# Altium PCB EEM_FMC_Carrier.PcbDoc (part 13 of 19)
Units mm, origin at the board's own origin, x right, y up, seen from the top; angles counter-clockwise.
Board outline 222.9 x 100 mm, 6 copper layers (TopLayer, MidLayer1, MidLayer2, SignalLayer1, Internal Plane 1, BottomLayer), stack 1.528 mm thick; 790 components, 743 nets, 3570 pads, 2277 vias.
Unrouted connection lines stored in the file: 3.
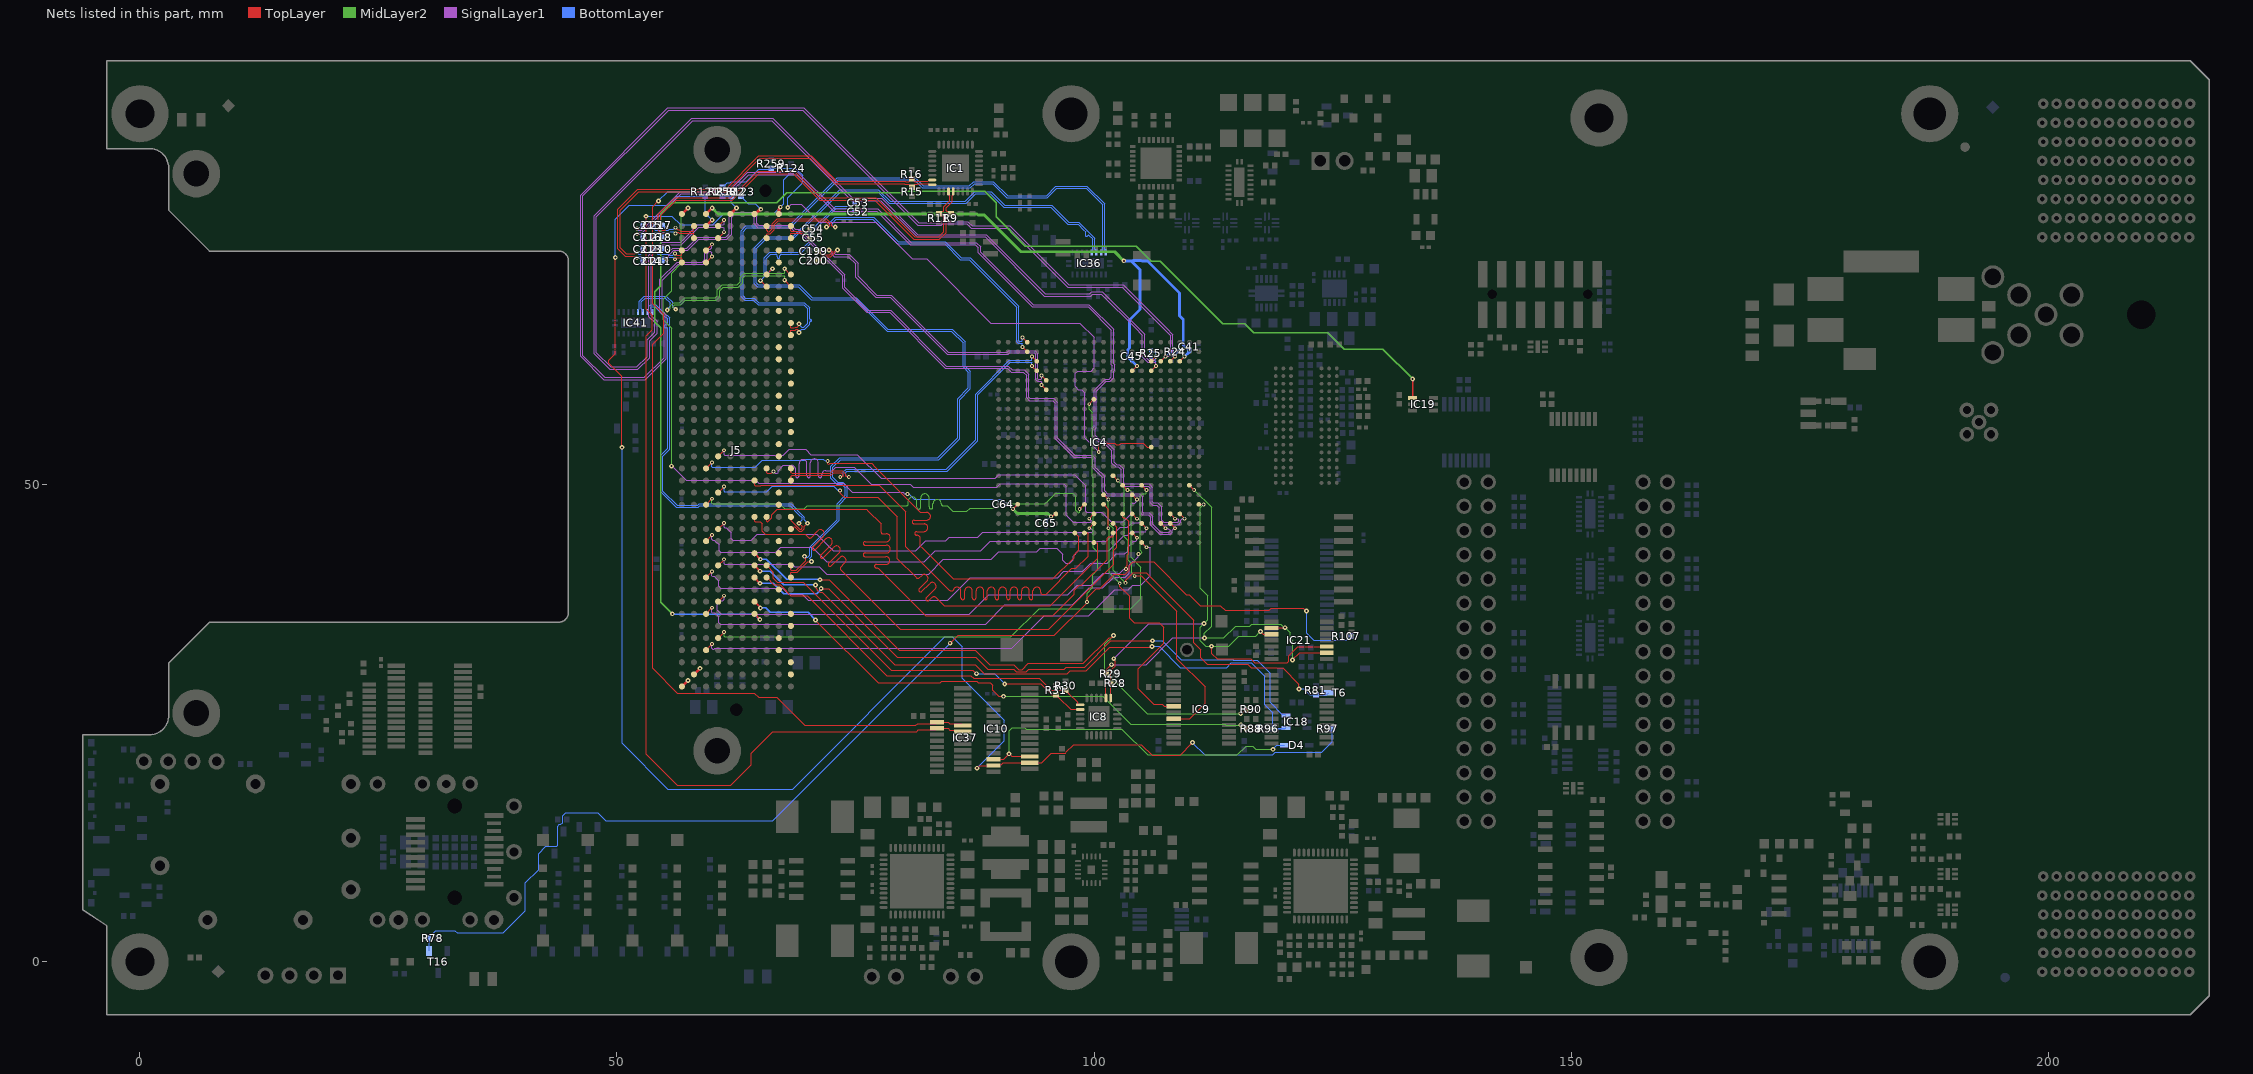
[diagram p15: the nets of this part, all layers, seen from the top]

## Via types
v1: diameter 0.4, hole 0.2, TopLayer to BottomLayer, tented both sides, 1032 vias
v2: diameter 0.5, hole 0.2, TopLayer to BottomLayer, tented both sides, 979 vias
v3: diameter 0.5, hole 0.2, TopLayer to BottomLayer, 162 vias
v4: diameter 0.8, hole 0.5, TopLayer to BottomLayer, tented both sides, 102 vias
v5: diameter 0.6, hole 0.3, TopLayer to BottomLayer, tented both sides, 2 vias

## Nets (pads, with @x,y where several pads share a name; then routed paths per layer and width w, separated by ;. In a path a pad name is that pad's centre, name@x,y a point inside that pad or via, vN(x,y) a via of type N, cw(c..) or ccw(c..) an arc to the next point about the centre after c; other vN are vias at no path point) (continued)
FMC.LA_P18: IC4.W11 J5.c22 | length 49.1
  TopLayer w0.085: J5.c22@65.688,51.719 65.688,51.24 65.738,51.19 65.909,51.19 65.923,51.204 66.189,51.204 66.381,51.396 v1(66.389,51.396) ; v1(99.498,46.45) IC4.W11@99.998,46.95
  SignalLayer1 w0.11: v1(66.389,51.396) 66.419,51.396 66.599,51.217 66.824,51.217 66.888,51.281 66.888,51.498 67.399,52.009 67.427,52.037 68.304,52.037 cw(c68.304,51.62) 68.721,51.62 68.721,50.934 ccw(c68.901,50.934) 69.081,50.934 69.081,52.222 cw(c69.498,52.222) 69.915,52.222 69.915,50.934 ccw(c70.095,50.934) 70.275,50.934 70.275,52.298 cw(c70.692,52.298) 71.109,52.298 71.109,50.934 ccw(c71.289,50.934) 71.469,50.934 71.469,51.058 cw(c71.886,51.058) 71.886,51.475 72.06,51.475 72.565,51.475 72.915,51.825 74.85,51.825 76.638,50.037 80.738,50.037 81.032,49.743 89.782,49.743 90.159,50.119 96.816,50.119 97.1,49.835 97.1,46.8 97.838,46.062 99.666,46.062 99.73,46.126 99.73,46.218 99.576,46.372 99.576,46.45 v1(99.498,46.45)
FMC.LA_P19: IC4.AA9 J5.h22 | length 56.4
  TopLayer w0.085: J5.h22@59.338,51.719 59.948,52.329 v1(59.948,52.35) ; v1(72.083,52.497) 72.11,52.47 72.11,52.231 72.171,52.169 72.242,52.169 72.307,52.234 76.69,52.234 77.025,51.9 77.175,51.75 81.629,47.296 81.703,47.222 ccw(c81.987,47.509) 81.704,47.221 ccw(c81.987,47.508) 81.987,47.105 82.464,47.105 cw(c82.464,46.7) 82.868,46.7 cw(c82.464,46.7) 82.464,46.296 81.144,46.296 ccw(c81.144,46.103) 80.952,46.103 ccw(c81.144,46.103) 81.144,45.911 82.183,45.911 cw(c82.183,45.506) 82.588,45.506 cw(c82.183,45.506) 82.183,45.102 81.407,45.102 ccw(c81.407,44.909) 81.215,44.909 ccw(c81.407,44.909) 81.407,44.717 ; 81.408,44.717 cw(c81.408,44.312) 81.812,44.312 81.812,43.563 81.975,43.4 85.175,40.2 85.225,40.15 95.7,40.15 97.913,42.363 97.913,42.663 98.379,43.129 98.379,44.33 98.388,44.338 98.388,44.56 IC4.AA9@97.998,44.95
  BottomLayer w0.085: v1(59.948,52.35) 59.948,51.871 59.998,51.821 60.737,51.821 60.741,51.825 64.475,51.825 65.212,52.562 69.712,52.562 69.837,52.687 71.631,52.687 71.806,52.512 72.067,52.512 v1(72.083,52.497)
FMC.LA_P20: IC4.U15 J5.g21 | length 52.3
  TopLayer w0.085: J5.g21@60.608,52.989 61.218,53.599 v1(61.218,53.62) ; IC4.U15@103.998,48.95 v1(104.498,48.45)
  SignalLayer1 w0.11: v1(61.218,53.62) 61.218,53.168 61.282,53.104 61.991,53.104 61.994,53.1 67.44,53.1 68.052,53.712 69.773,53.712 70.323,53.162 75.198,53.162 77.673,50.687 88.498,50.687 89.627,50.687 90.002,51.062 97.998,51.062 99.15,49.91 99.15,47.225 99.256,47.119 100.831,47.119 101.831,46.119 103.059,46.119 103.829,46.889 103.829,47.865 104.032,48.068 104.275,48.068 104.443,48.236 104.443,48.394 v1(104.498,48.45)
FMC.LA_P21: IC4.V10 J5.h25 | length 49.4
  TopLayer w0.085: J5.h25@59.338,47.909 59.948,48.519 v1(59.948,48.54) ; v1(98.498,47.45) IC4.V10@98.998,47.95
  MidLayer2 w0.11: v1(59.948,48.54) 59.948,48.088 60.012,48.024 67.026,48.024 67.575,47.475 69.625,47.475 69.943,47.793 80.154,47.793 80.327,47.793 ccw(c80.327,47.998) 80.532,47.998 80.532,48.28 cw(c80.974,48.28) 80.974,48.722 cw(c80.974,48.28) 81.416,48.28 81.416,47.647 ccw(c81.621,47.647) 81.621,47.442 ccw(c81.621,47.647) 81.826,47.647 81.826,48.603 cw(c82.268,48.603) 82.268,49.045 cw(c82.268,48.603) 82.71,48.603 82.71,47.674 ccw(c82.915,47.674) 82.915,47.469 ccw(c82.915,47.674) 83.12,47.674 83.12,47.998 cw(c83.562,47.998) 83.562,48.44 cw(c83.562,47.998) 84.004,47.998 ccw(c84.209,47.998) 84.209,47.793 84.632,47.793 84.774,47.651 85.207,47.218 86.682,47.218 87.027,47.562 89.902,47.562 90.365,48.025 94.915,48.025 96.002,49.112 97.748,49.112 98.072,48.788 98.072,47.331 98.334,47.068 98.425,47.068 98.498,47.141 v1(98.498,47.45)
FMC.LA_P22: IC4.AB11 J5.g24 | length 58.8
  TopLayer w0.085: J5.g24@60.608,49.179 61.218,49.789 v1(61.218,49.81) ; v1(73.372,49.389) 73.38,49.381 73.38,49.111 73.804,48.687 77.338,48.687 79.375,46.65 79.375,42.275 81.3,40.35 81.374,40.276 81.405,40.245 ccw(c81.541,40.381) 81.677,40.245 81.922,40.49 cw(c82.207,40.203) 82.493,40.489 cw(c82.207,40.203) 82.524,39.952 82.524,39.948 81.686,39.11 ccw(c81.823,38.974) 81.686,38.838 ccw(c81.823,38.974) 81.959,38.838 ; 81.959,38.838 82.767,39.646 cw(c83.051,39.359) 83.337,39.645 cw(c83.051,39.359) 83.368,39.107 83.368,39.104 82.424,38.159 ccw(c82.56,38.023) 82.424,37.887 ccw(c82.56,38.023) 82.696,37.886 ; 82.696,37.887 82.944,38.134 cw(c83.23,37.848) 83.481,38.165 83.485,38.165 84.325,37.325 85.1,37.325 95.4,37.325 100.392,42.317 100.392,43.9 100.342,43.95 IC4.AB11@99.998,43.95
  BottomLayer w0.085: v1(61.218,49.81) 61.218,49.331 61.268,49.281 65.681,49.281 66.262,49.862 72.702,49.862 73.127,49.437 73.324,49.437 v1(73.372,49.389)
FMC.LA_P23: IC4.AA10 J5.d23 | length 62.2
  TopLayer w0.085: J5.d23@64.418,50.449 64.418,49.97 64.468,49.92 65.082,49.92 65.125,49.962 77.488,49.962 80.275,47.175 80.275,43.5 82.275,41.5 82.425,41.35 84.604,39.171 84.821,38.954 ccw(c85.05,39.286) 85.248,38.935 cw(c85.648,38.874) 85.648,39.279 cw(c85.648,38.874) 86.053,38.874 86.053,38.152 ccw(c86.245,38.152) 86.245,37.96 ccw(c86.245,38.152) 86.438,38.152 86.438,38.874 cw(c86.842,38.874) 86.842,39.279 cw(c86.842,38.874) 87.247,38.874 87.247,38.152 ccw(c87.439,38.152) 87.439,37.96 ccw(c87.439,38.152) 87.632,38.152 87.632,38.874 cw(c88.036,38.874) 88.036,39.279 cw(c88.036,38.874) 88.441,38.874 88.441,38.152 ccw(c88.633,38.152) 88.633,37.96 ccw(c88.633,38.152) 88.826,38.152 88.826,38.874 cw(c89.23,38.874) 89.23,39.279 cw(c89.23,38.874) 89.635,38.874 89.635,38.152 ccw(c89.827,38.152) 89.827,37.96 ccw(c89.827,38.152) 90.02,38.152 90.02,38.874 cw(c90.424,38.874) 90.424,39.279 cw(c90.424,38.874) 90.829,38.874 90.829,38.152 ccw(c91.021,38.152) 91.021,37.96 ccw(c91.021,38.152) 91.214,38.152 91.214,38.874 cw(c91.618,38.874) 91.618,39.279 cw(c91.618,38.874) 92.023,38.874 92.023,38.152 ccw(c92.215,38.152) 92.215,37.96 ccw(c92.215,38.152) 92.408,38.152 92.408,38.874 cw(c92.812,38.874) 92.812,39.279 cw(c92.812,38.874) 93.217,38.874 93.217,38.152 ccw(c93.409,38.152) 93.409,37.96 ccw(c93.409,38.152) 93.602,38.152 93.602,38.874 cw(c94.006,38.874) 94.006,39.279 cw(c94.006,38.874) 94.411,38.874 94.411,38.717 ccw(c94.603,38.717) 94.603,38.525 94.975,38.525 95.162,38.711 97.685,41.235 98.11,41.235 99.392,42.517 99.392,44.9 99.342,44.95 IC4.AA10@98.998,44.95
FMC.LA_P24: IC4.W15 J5.h28 | length 51
  TopLayer w0.085: J5.h28@59.338,44.099 59.948,44.709 v1(59.948,44.73) ; IC4.W15@103.998,46.95 v1(104.498,46.45)
  SignalLayer1 w0.11: v1(59.948,44.73) 59.948,44.278 60.012,44.214 60.202,44.214 60.7,43.715 60.7,43.075 60.825,42.95 66.665,42.95 67.177,43.462 70.463,43.462 72,41.925 82.19,41.925 83.377,43.112 88.153,43.112 89.117,44.076 101.291,44.076 102.74,45.525 103.475,45.525 103.998,46.048 104.702,46.048 104.834,46.179 104.834,46.271 104.71,46.394 104.554,46.394 v1(104.498,46.45)
FMC.LA_P25: IC4.Y11 J5.g27 | length 44
  TopLayer w0.085: J5.g27@60.608,45.369 61.218,45.979 v1(61.218,46) ; v1(99.498,45.45) IC4.Y11@99.998,45.95
  SignalLayer1 w0.11: v1(61.218,46) 61.218,45.548 61.282,45.484 61.472,45.484 61.995,44.96 61.995,44.365 62.148,44.212 64.087,44.212 64.687,44.812 70.913,44.812 72.65,43.075 81.325,43.075 82.375,44.125 84.475,44.125 84.837,44.487 87.802,44.487 88.333,45.018 99.815,45.018 99.88,45.082 99.88,45.25 99.735,45.395 99.553,45.395 v1(99.498,45.45)
FMC.LA_P26: IC4.Y13 J5.d26 | length 64.1
  TopLayer w0.085: J5.d26@64.418,46.639 64.418,46.16 64.468,46.11 65.025,46.11 65.226,45.909 65.226,45.149 65.55,44.825 69.725,44.825 69.975,44.575 70.08,44.47 ccw(c70.216,44.606) 70.352,44.47 71.048,45.166 cw(c71.333,44.879) 71.619,45.165 cw(c71.333,44.879) 71.65,44.627 71.65,44.624 70.499,43.473 ccw(c70.635,43.337) 70.499,43.201 ccw(c70.635,43.337) 70.772,43.201 71.892,44.321 cw(c72.177,44.034) 72.463,44.32 cw(c72.177,44.034) 72.494,43.783 72.494,43.779 71.344,42.629 ccw(c71.48,42.493) 71.344,42.356 ccw(c71.48,42.493) 71.616,42.356 72.737,43.477 cw(c73.021,43.19) 73.307,43.476 cw(c73.021,43.19) 73.338,42.939 73.338,42.935 72.188,41.784 ccw(c72.324,41.648) 72.188,41.512 ccw(c72.324,41.648) 72.46,41.512 ; 72.461,41.513 73.325,42.377 cw(c73.61,42.09) 73.896,42.376 cw(c73.61,42.09) 73.896,41.804 73.457,41.365 ccw(c73.593,41.229) 73.457,41.093 73.9,40.65 79.675,34.875 95.275,34.875 102.088,41.688 102.088,43.138 102.379,43.429 102.379,45.33 102.388,45.338 102.388,45.56 IC4.Y13@101.998,45.95
FMC.LA_P27: IC4.AA13 J5.c26 | length 63.2
  TopLayer w0.085: J5.c26@65.688,46.639 65.688,46.16 65.738,46.11 65.808,46.11 65.858,46.16 ; 65.858,46.16 66.238,46.54 66.238,46.863 66.787,47.412 76.188,47.412 76.25,47.35 77.675,45.925 77.675,45.2 77.675,45.051 ccw(c77.867,45.051) 77.867,44.859 78.245,44.859 cw(c78.245,44.454) 78.65,44.454 cw(c78.245,44.454) 78.245,44.05 76.005,44.05 ccw(c76.005,43.857) 75.812,43.857 ccw(c76.005,43.857) 76.005,43.665 78.245,43.665 cw(c78.245,43.26) 78.65,43.26 cw(c78.245,43.26) 78.245,42.856 76.005,42.856 ccw(c76.005,42.663) 75.812,42.663 ccw(c76.005,42.663) 76.005,42.471 78.189,42.471 cw(c78.189,42.066) 78.594,42.066 cw(c78.189,42.066) 78.189,41.662 77.18,41.662 ccw(c77.18,41.469) 76.988,41.469 ccw(c77.18,41.469) 77.18,41.277 cw(c77.18,40.872) 77.432,41.19 77.435,41.19 77.466,41.159 78.575,40.05 80.325,38.3 80.475,38.15 82.375,36.25 95.65,36.25 97.938,38.538 97.938,38.934 98.454,39.45 98.675,39.45 101.379,42.154 101.379,44.382 101.553,44.556 101.948,44.556 101.998,44.606 IC4.AA13@101.998,44.95
FMC.LA_P28: IC4.AA15 J5.h31 | length 51.1
  TopLayer w0.085: J5.h31@59.338,40.289 59.948,40.899 v1(59.948,40.92) ; IC4.AA15@103.998,44.95 v1(104.498,44.45)
  SignalLayer1 w0.11: v1(59.948,40.92) 59.948,40.468 60.012,40.404 60.202,40.404 60.65,39.955 60.65,39.35 60.825,39.175 67.362,39.175 68.025,38.512 69.438,38.512 70.063,37.887 84.662,37.887 87.037,40.262 96.177,40.262 96.84,40.925 98.815,40.925 99.665,41.775 101.365,41.775 102.34,42.75 103.213,42.75 103.513,43.05 103.513,43.473 104.108,44.068 104.35,44.068 104.467,44.185 104.467,44.419 v1(104.498,44.45)
FMC.LA_P29: IC4.Y16 J5.g30 | length 50.9
  TopLayer w0.085: J5.g30@60.608,41.559 61.218,42.169 v1(61.218,42.19) ; IC4.Y16@104.998,45.95 v1(105.498,45.45)
  SignalLayer1 w0.11: v1(61.218,42.19) 61.218,41.738 61.282,41.674 68.351,41.674 68.613,41.412 71.213,41.412 72,40.625 82.665,40.625 84.215,42.175 89.215,42.175 90.034,42.994 93.984,42.994 94.352,43.362 96.088,43.362 96.715,42.735 96.715,42.085 97.025,41.775 97.44,41.775 97.8,42.135 97.8,42.535 98.365,43.1 101.54,43.1 103.152,44.712 103.545,44.712 103.902,45.068 105.4,45.068 105.492,45.16 105.492,45.444 v1(105.498,45.45)
FMC.LA_P30: IC4.T16 J5.h34 | length 58.9
  TopLayer w0.085: J5.h34@59.338,36.479 59.948,37.089 v1(59.948,37.11) ; IC4.T16@104.998,49.95 v1(105.498,49.45)
  MidLayer2 w0.11: v1(104.648,42.75) 104.668,42.77 104.924,42.77 105.013,42.858 105.013,42.949 104.829,43.133 104.829,45.587 104.829,48.865 105.032,49.068 105.434,49.068 105.498,49.133 v1(105.498,49.45)
  SignalLayer1 w0.11: v1(59.948,37.11) 59.948,36.658 60.012,36.594 60.202,36.594 60.65,36.145 60.65,35.562 60.812,35.4 88.64,35.4 90.665,37.425 97.765,37.425 99.527,39.187 100.939,39.187 102.052,40.3 103.3,40.3 103.713,40.713 103.713,41.558 104.628,42.474 104.628,42.73 v1(104.648,42.75)
FMC.LA_P31: IC4.W14 J5.g33 | length 54.2
  TopLayer w0.085: J5.g33@60.608,37.749 61.218,38.359 v1(61.218,38.38) ; IC4.W14@102.998,46.95 102.998,46.606 103.048,46.556 103.227,46.556 103.616,46.167 103.616,42.793 103.467,42.644 103.467,41.577 103.357,41.467 103.357,41.198 v1(103.366,41.189)
  SignalLayer1 w0.11: v1(61.218,38.38) 61.218,38.005 61.075,37.862 60.691,37.862 60.488,37.659 60.488,36.827 60.902,36.413 86.913,36.413 88.963,38.463 97.238,38.463 98.263,39.488 99.716,39.488 100.958,40.73 102.685,40.73 103.107,41.152 103.329,41.152 v1(103.366,41.189)
FMC.LA_P32: IC4.AB16 J5.h37 | length 54.5
  TopLayer w0.085: J5.h37@59.338,32.669 59.948,33.279 v1(59.948,33.3) ; IC4.AB16@104.998,43.95 v1(105.498,43.45)
  SignalLayer1 w0.11: v1(59.948,33.3) 59.948,32.848 60.012,32.784 60.182,32.784 60.261,32.862 91.352,32.862 94.765,36.275 99.465,36.275 102.19,39 103.59,39 104.083,39.493 104.908,39.493 105.888,40.473 105.888,41.933 105.888,42.45 105.888,43.386 105.824,43.45 v1(105.498,43.45)
FMC.LA_P33: IC4.T14 J5.g36 | length 59.5
  TopLayer w0.085: J5.g36@60.608,33.939 61.218,34.549 v1(61.218,34.57) ; IC4.T14@102.998,49.95 v1(103.498,49.45)
  MidLayer2 w0.11: v1(61.218,34.57) 61.218,34.118 61.282,34.054 91.268,34.054 94.24,37.025 103.85,37.025 104.888,38.063 104.888,41.377 103.88,42.385 103.88,49.386 103.815,49.45 v1(103.498,49.45)
FMC_CLK.CLK_BIDIR_N2: C211.2 IC4.Y19 | length 79.6
  TopLayer w0.085: IC4.Y19@107.998,45.95 v1(108.498,45.45)
  SignalLayer1 w0.11: v1(55.221,73.546) 55.276,73.602 55.276,73.766 55.425,73.915 55.425,74.064 55.936,74.575 57.41,74.575 58.568,75.732 61.504,75.732 62.012,76.241 62.012,78.062 62.275,78.325 64.1,78.325 64.4,78.025 64.4,77.339 64.776,76.963 68.187,76.963 68.594,76.556 69.009,76.556 73.65,71.915 73.65,70.615 76.202,68.063 78.577,68.063 84.427,62.213 90.932,62.213 91.332,61.813 92.603,61.813 92.925,61.49 92.925,59.102 93.202,58.825 95.666,58.825 95.93,58.562 95.93,54.82 97.887,52.863 99.687,52.863 99.884,52.666 99.884,51.766 100.875,50.775 100.875,49.27 101.294,48.85 104.675,48.85 104.871,48.654 104.871,47.049 105.074,46.845 105.668,46.845 105.93,46.583 105.93,45.768 106.89,44.808 107.975,44.808 108.207,45.04 108.207,45.221 108.435,45.45 v1(108.498,45.45)
  BottomLayer w0.085: C211.2@54.673,73.45 54.769,73.546 v1(55.221,73.546)
FMC_CLK.CLK_BIDIR_N3: C216.2 IC4.W20 | length 90.6
  TopLayer w0.085: IC4.W20@108.998,46.95 v1(109.498,46.45)
  SignalLayer1 w0.11: v1(52.098,76.275) 52.126,76.275 52.307,76.457 52.706,76.457 56.738,80.488 61.763,80.488 63.8,82.525 68.865,82.525 72.715,78.675 77.215,78.675 80.74,75.15 87.575,75.15 87.888,74.837 87.888,74.302 93.54,68.65 99.375,68.65 101.825,66.2 101.825,62.591 101.931,62.485 101.931,62.081 101.829,61.979 101.829,61.313 101.594,61.078 101.193,61.078 100.007,59.893 100.007,56.068 99.882,55.942 99.882,55.108 100.49,54.5 100.925,54.5 101.863,53.562 101.863,52.282 102.263,51.882 102.558,51.882 102.863,51.577 102.863,50.127 103.14,49.85 105.688,49.85 105.888,49.65 105.888,48.139 106.152,47.875 106.575,47.875 106.863,47.587 106.863,46.202 107.227,45.838 108.871,45.838 109.117,46.083 109.117,46.3 109.234,46.418 109.466,46.418 v1(109.498,46.45)
  BottomLayer w0.085: v1(52.098,76.275) 52.103,76.275 52.297,76.469 52.481,76.469 52.53,76.419 52.53,76.217 C216.2@52.798,75.95
FMC_CLK.CLK_BIDIR_P2: C210.2 IC4.Y18 | length 79
  TopLayer w0.085: IC4.Y18@106.998,45.95 v1(107.498,45.45)
  SignalLayer1 w0.11: v1(55.264,74.52) 55.308,74.476 55.36,74.528 55.554,74.528 55.838,74.812 57.312,74.812 58.469,75.969 61.406,75.969 61.775,76.339 61.775,78.16 62.177,78.562 64.198,78.562 64.637,78.123 64.637,77.437 64.874,77.2 68.285,77.2 68.693,76.793 69.107,76.793 73.887,72.013 73.887,70.713 76.3,68.3 78.675,68.3 84.525,62.45 91.03,62.45 91.43,62.05 92.701,62.05 93.162,61.588 93.162,59.2 93.3,59.062 95.765,59.062 96.167,58.66 96.167,54.918 97.985,53.1 99.785,53.1 100.121,52.765 100.121,51.865 101.112,50.873 101.112,49.368 101.393,49.087 104.773,49.087 105.108,48.752 105.108,47.147 105.173,47.082 105.766,47.082 106.167,46.681 106.167,45.866 106.988,45.045 107.877,45.045 107.97,45.138 107.97,45.229 107.804,45.394 107.554,45.394 v1(107.498,45.45)
  BottomLayer w0.085: C210.2@54.698,74.7 54.877,74.52 v1(55.264,74.52)
FMC_CLK.CLK_BIDIR_P3: C215.2 IC4.W19 | length 90.2
  TopLayer w0.085: IC4.W19@107.998,46.95 v1(108.498,46.45)
  SignalLayer1 w0.11: v1(52.098,76.875) 52.126,76.875 52.307,76.694 52.608,76.694 56.64,80.725 61.665,80.725 63.702,82.762 68.963,82.762 72.813,78.912 77.313,78.912 80.838,75.387 87.673,75.387 88.125,74.935 88.125,74.4 93.638,68.887 99.473,68.887 102.062,66.298 102.062,62.689 102.168,62.583 102.168,61.983 102.066,61.881 102.066,61.215 101.692,60.841 101.291,60.841 100.244,59.794 100.244,55.969 100.119,55.844 100.119,55.207 100.588,54.737 101.023,54.737 102.1,53.66 102.1,52.38 102.361,52.119 102.656,52.119 103.1,51.675 103.1,50.225 103.238,50.087 105.786,50.087 106.125,49.748 106.125,48.237 106.25,48.112 106.673,48.112 107.1,47.685 107.1,46.3 107.325,46.075 108.773,46.075 108.88,46.182 108.88,46.3 108.762,46.418 108.53,46.418 v1(108.498,46.45)
  BottomLayer w0.085: v1(52.098,76.875) 52.103,76.875 52.297,76.681 52.481,76.681 52.53,76.731 52.53,76.933 C215.2@52.798,77.2
FMC_CLK.CLK_M2C_N0: IC4.C19 J5.h5 R24.2 | length 124.3
  TopLayer w0.085: J5.h5@59.338,73.309 59.948,73.919 v1(59.948,73.94) ; IC4.C19@107.998,62.95 v1(108.498,63.45)
  SignalLayer1 w0.11: v1(59.948,73.94) 59.948,74.309 59.8,74.457 59.709,74.457 59.45,74.198 59.45,73.525 59.038,73.113 56.413,73.113 54.725,71.425 54.725,68.234 55.187,67.772 55.187,63.227 52.973,61.013 48.627,61.013 46.188,63.452 46.188,80.373 55.327,89.512 69.573,89.512 81.642,77.443 83.908,77.443 84.059,77.594 86.766,77.594 87.223,77.137 91.148,77.137 97.335,70.95 103.06,70.95 107.56,66.45 108.275,65.735 108.275,63.9 108.117,63.742 108.117,63.514 108.181,63.45 v1(108.498,63.45)
  BottomLayer w0.085: v1(108.498,63.45) 108.498,63.535 108.641,63.678 108.641,63.783 108.808,63.95 R24.2@108.828,63.95
FMC_CLK.CLK_M2C_N1: IC4.C17 J5.g3 R25.2 | length 120.1
  TopLayer w0.085: J5.g3@60.608,75.849 61.218,76.459 v1(61.218,76.48) ; IC4.C17@105.998,62.95 v1(106.498,63.45)
  SignalLayer1 w0.11: v1(61.218,76.48) 61.218,76.932 61.154,76.997 58.572,76.997 56.757,75.182 54.782,75.182 53.587,73.987 53.587,67.738 54.2,67.125 54.2,65.901 53.412,65.113 53.412,63.337 52.188,62.113 49.227,62.113 47.613,63.727 47.613,75.323 47.613,78.198 57.826,88.411 66.326,88.411 74.725,80.012 77.763,80.012 81.55,76.225 88.7,76.225 94.906,70.019 99.548,70.019 99.766,70.237 100.863,70.237 104.65,66.45 105.3,65.8 105.3,63.5 105.731,63.069 106.4,63.069 106.492,63.16 106.492,63.444 v1(106.498,63.45)
  BottomLayer w0.085: R25.2@105.973,64.105 106.108,63.97 106.353,63.97 106.498,63.825 v1(106.498,63.45)
FMC_CLK.CLK_M2C_P0: IC4.C18 J5.h4 R24.1 | length 123.4
  TopLayer w0.085: J5.h4@59.338,74.579 59.948,75.189 v1(59.948,75.21) ; IC4.C18@106.998,62.95 v1(107.498,63.45)
  SignalLayer1 w0.11: v1(59.948,75.21) 59.948,74.842 59.8,74.694 59.611,74.694 59.213,74.296 59.213,73.623 58.94,73.35 56.315,73.35 54.488,71.523 54.488,68.136 54.95,67.674 54.95,63.325 52.875,61.25 48.725,61.25 46.425,63.55 46.425,80.275 55.425,89.275 69.475,89.275 81.544,77.206 84.006,77.206 84.157,77.357 86.668,77.357 87.125,76.9 91.05,76.9 97.237,70.713 102.962,70.713 107.225,66.45 108.038,65.637 108.038,63.998 107.88,63.84 107.88,63.514 107.815,63.45 v1(107.498,63.45)
  BottomLayer w0.085: v1(107.498,63.45) 107.831,63.783 108.001,63.783 R24.1@108.168,63.95
FMC_CLK.CLK_M2C_P1: IC4.D17 J5.g2 R25.1 | length 119.5
  TopLayer w0.085: J5.g2@60.608,77.119 61.218,77.729 v1(61.218,77.75) ; IC4.D17@105.998,61.95 v1(106.498,62.45)
  SignalLayer1 w0.11: v1(61.218,77.75) 61.218,77.298 61.154,77.234 58.473,77.234 56.659,75.419 54.684,75.419 53.35,74.085 53.35,67.64 53.963,67.027 53.963,65.999 53.175,65.211 53.175,63.435 52.09,62.35 49.325,62.35 47.85,63.825 47.85,78.1 57.924,88.174 66.228,88.174 74.627,79.775 77.665,79.775 81.452,75.988 88.602,75.988 94.808,69.782 99.646,69.782 99.864,70 100.765,70 104.315,66.45 105.063,65.702 105.063,63.402 105.633,62.832 106.4,62.832 106.492,62.74 106.492,62.456 v1(106.498,62.45)
  BottomLayer w0.085: R25.1@105.973,63.445 105.973,63.425 106.14,63.258 106.16,63.258 106.498,62.92 v1(106.498,62.45)
FMC_CLK_BIDIR_N2: C211.1 C214.1 J5.k5 | length 3.9
  TopLayer w0.1: v1(56.073,73.644) 56.112,73.644 56.282,73.814 56.734,73.814 56.798,73.749 J5.k5@56.798,73.309
  BottomLayer w0.1: C211.1@53.773,73.45 54.033,73.71 54.033,73.718 54.238,73.923 55.313,73.923 55.406,73.83 55.864,73.83 56.051,73.644 v1(56.073,73.644)
FMC_CLK_BIDIR_N3: C216.1 C218.1 J5.j3 | length 5.4
  TopLayer w0.1: v1(56.123,76.35) 56.204,76.35 56.318,76.464 56.436,76.464 56.551,76.349 58.009,76.349 58.068,76.291 J5.j3@58.068,75.849
  BottomLayer w0.1: C216.1@53.698,75.95 53.958,76.21 53.958,76.403 54.017,76.462 55.489,76.462 55.564,76.537 55.914,76.537 56.101,76.35 v1(56.123,76.35)
FMC_CLK_BIDIR_P2: C210.1 C213.1 J5.k4 | length 3.9
  TopLayer w0.1: v1(56.073,74.244) 56.112,74.244 56.282,74.074 56.734,74.074 56.798,74.138 J5.k4@56.798,74.579
  BottomLayer w0.1: C210.1@53.798,74.7 53.798,74.6 53.958,74.44 54.008,74.44 54.298,74.15 55.407,74.15 55.5,74.057 55.864,74.057 56.051,74.244 v1(56.073,74.244)
FMC_CLK_BIDIR_P3: C215.1 C217.1 J5.j2 | length 5.4
  TopLayer w0.1: v1(56.123,76.95) 56.166,76.95 56.384,76.732 56.531,76.732 56.664,76.599 58.009,76.599 58.068,76.658 J5.j2@58.068,77.119
  BottomLayer w0.1: C215.1@53.698,77.2 53.958,76.94 53.958,76.747 54.017,76.689 55.395,76.689 55.47,76.764 55.914,76.764 56.101,76.95 v1(56.123,76.95)
FMC_CLK_DIR: IC10.22 IC37.5 J5.b1 R124.2 | length 114.7
  TopLayer w0.125: v2(53.048,78.15) 53.048,68.425 53.7,67.773 53.7,66.275 53.048,65.623 53.048,21.777 56.3,18.525 61.944,18.525 64.063,20.643 64.063,21.84 66.348,24.125 81.4,24.125 81.588,24.313 83.388,24.313 IC37.5@83.55,24.475 84.705,24.475 84.893,24.288 86.086,24.288 IC10.22@86.248,24.125
  TopLayer w0.3: J5.b1@66.958,78.389 67,78.431 v2@67,78.923
  BottomLayer w0.125: v2(53.048,78.15) 55.748,78.15 56.661,77.238 60.033,77.238 61.246,78.45 66.473,78.45 v2(67.123,79.1) 67.5,79.477 67.5,81.982 68.001,82.483 68.001,82.503 68.228,82.73 R124.2@68.248,82.73
FMC_I2C.SCL: IC8.2 J5.c30 R31.1 | length 39.5
  TopLayer w0.125: J5.c30@65.688,41.559 66.398,40.849 66.398,40.182 66.805,39.775 69.548,39.775 78.748,30.575 87.298,30.575 v2(87.673,30.2) ; v2(90.648,29.125) 94.423,29.125 95.568,27.98 R31.1@96.023,27.98 96.043,27.98 96.27,27.753 96.27,27.733 97.553,26.45 IC8.2@98.548,26.45
  BottomLayer w0.125: v2(87.673,30.2) 89.573,30.2 v2(90.648,29.125)
FMC_I2C.SDA: IC8.1 J5.c31 R30.1 | length 38.5
  TopLayer w0.125: J5.c31@65.688,40.289 66.452,39.525 67.118,39.525 67.757,38.887 67.757,38.823 68.205,38.375 69.923,38.375 78.298,30 87.1,30 87.375,29.725 94.248,29.725 95.494,28.479 96.396,28.479 96.397,28.48 R30.1@97.023,28.48 97.043,28.48 97.27,28.253 97.27,28.228 98.284,27.214 98.284,27.031 98.365,26.95 IC8.1@98.548,26.95
FMC_JTAG.TCK: J5.d29 R90.2 | length 65.2
  TopLayer w0.125: v2(71.273,40.05) 72.223,40.05 79.598,32.675 87.548,32.675 89.098,31.125 91.605,31.125 91.852,30.879 91.852,30.871 92.098,30.625 92.473,30.625 93.123,31.275 98.895,31.275 101.596,33.975 101.787,33.975 102.012,34.2 v2(102.048,34.2) ; v2(115.373,26.025) 115.43,26.025 115.634,26.229 115.807,26.229 R90.2@116.028,26.45
  TopLayer w0.15: J5.d29@64.418,42.829 64.418,42.805 v2(65.023,42.2)
  MidLayer2 w0.125: v2(102.048,34.2) 101.123,33.275 101.123,30.475 105.573,26.025 v2(115.373,26.025)
  BottomLayer w0.15: v2(65.023,42.2) 65.648,42.2 67.773,40.075 71.248,40.075 v2(71.273,40.05)
FMC_JTAG.TDI: IC18.1 J5.d30 R96.2 | length 68.5
  TopLayer w0.125: v2(70.798,39.5) 70.857,39.441 70.857,39.191 70.997,39.051 70.997,38.959 71.232,38.724 71.525,38.724 79.123,31.125 87.548,31.125 88.498,30.175 97.18,30.175 97.53,30.525 99.173,30.525 101.636,32.988 106.018,32.988 v2(106.089,33.059)
  TopLayer w0.15: J5.d30@64.418,41.559 64.418,41.53 v2(64.998,40.95)
  BottomLayer w0.125: v2(106.089,33.059) 106.839,33.059 109.048,30.85 113.923,30.85 114.398,31.325 116.498,31.325 117.875,29.948 117.875,26.948 118.718,26.105 R96.2@118.718,24.45
  BottomLayer w0.15: v2(64.998,40.95) 66.048,40.95 67.498,39.5 v2(70.798,39.5) ; R96.2@118.718,24.45 120.048,24.45 IC18.1@120.123,24.525
FMC_JTAG.TDO: IC18.3 J5.d31 | length 66.7
  TopLayer w0.125: v2(71.398,39.125) 72.198,39.125 79.398,31.925 87.623,31.925 88.873,30.675 91.573,30.675 91.837,30.411 92.898,30.411 93.162,30.675 96.873,30.675 97.098,30.9 99.023,30.9 101.773,33.65 v2(106.123,33.65)
  TopLayer w0.15: J5.d31@64.418,40.289 64.418,40.262 64.976,39.704 v2(64.976,39.677)
  BottomLayer w0.125: v2(106.123,33.65) 107.148,33.65 109.123,31.675 114.58,31.675 114.62,31.635 117.088,31.635 118.45,30.273 118.45,27.2 119.688,25.963 119.986,25.963 IC18.3@120.123,25.825
  BottomLayer w0.15: v2(64.976,39.677) 66.396,39.677 67.498,38.575 70.948,38.575 71.262,38.889 71.262,38.894 71.398,39.03 v2(71.398,39.125)
FMC_JTAG.TMS: J5.d33 R88.2 | length 57.6
  TopLayer w0.125: v2(70.798,35.825) 77.373,29.25 83.875,29.25 84.025,29.4 87.725,29.4 87.875,29.25 89.123,29.25 89.378,28.995 89.378,28.485 90.038,27.825 v2(90.5,27.825) ; v2(115.407,24.816) 115.464,24.759 115.719,24.759 115.781,24.697 115.801,24.697 116.028,24.47 R88.2@116.028,24.45
  TopLayer w0.15: J5.d33@64.418,37.749 65.023,37.144 v2(65.023,37.1)
  MidLayer2 w0.125: v2(90.5,27.825) 100.923,27.825 103.848,24.9 113.748,24.9 113.832,24.816 v2(115.407,24.816)
  BottomLayer w0.15: v2(65.023,37.1) 65.567,37.1 66.04,36.627 70.021,36.627 70.798,35.85 v2(70.798,35.825)
FMC_JTAG.TRSTn: IC19.4 J5.d34 | length 144
  TopLayer w0.15: J5.d34@64.418,36.479 64.973,35.924 v2(64.973,35.875) ; IC19.4@133.398,59.1 133.398,61.098 v2(133.4,61.1)
  MidLayer2 w0.15: v2(55.798,36.475) 54.573,37.7 54.573,66.45 53.975,67.048 53.975,70.252 54.573,70.85 54.573,78.425 55.737,79.589 66.762,79.589 67.798,80.625 79.831,80.625 79.981,80.775 88.55,80.775 89.738,79.587 89.738,78.08 92.818,75 104.45,75 106.025,73.425 106.948,73.425 110.198,70.175 113.498,66.875 115.8,66.875 116.75,65.925 124.525,65.925 126.225,64.225 129.448,64.225 130.275,64.225 v2(133.4,61.1)
  BottomLayer w0.15: v2(55.798,36.475) 55.848,36.425 64.423,36.425 v2(64.973,35.875)
FMC_JTAG_Override: D4.2 IC10.3 IC37.15 | length 37.4
  TopLayer w0.125: IC37.15@89.45,21.225 90.523,21.225 v2(91.098,21.8) 91.373,21.525 IC10.3@93.248,21.525
  MidLayer2 w0.125: v2(91.098,21.8) 91.098,24.225 91.412,24.539 92.76,24.539 92.898,24.4 102.925,24.4 105.639,21.686 115.034,21.686 115.936,22.589 116.659,22.589 116.972,22.275 v2(118.748,22.275)
  BottomLayer w0.125: v2(118.748,22.275) 119.173,22.7 D4.2@119.948,22.7
FMC_MGT.DP_C2M_N0: IC4.A4 J5.c3 | length 38.3
  TopLayer w0.085: J5.c3@65.688,75.849 65.708,75.868 65.708,76.288 65.758,76.339 66.064,76.339 66.468,76.742 66.468,77.267 66.889,77.688 71.845,77.688 72.317,77.216 72.317,77.145 72.267,77.095 72.043,77.095 v2(71.973,77.025) ; v1(92.498,65.45) IC4.A4@92.998,64.95
  BottomLayer w0.085: v2(71.973,77.025) 72.052,77.104 72.244,77.104 72.325,77.185 72.325,77.459 72.903,78.037 76.642,78.037 76.888,78.037 79.463,75.462 84.425,75.462 86.075,73.812 87.013,73.812 92.1,68.725 92.1,65.106 92.15,65.056 92.448,65.056 92.498,65.106 v1(92.498,65.45)
FMC_MGT.DP_C2M_N1: IC4.C5 J5.a23 | length 35.9
  TopLayer w0.085: J5.a23@68.228,50.449 68.235,50.456 68.235,50.846 68.366,50.978 72.2,50.978 72.426,50.978 72.711,51.263 73.5,51.263 73.742,51.021 73.742,50.95 73.692,50.9 73.473,50.9 v1(73.398,50.825) ; v1(93.498,63.45) IC4.C5@93.998,62.95
  BottomLayer w0.085: v1(73.398,50.825) 73.477,50.904 73.65,50.904 73.742,50.996 73.742,51.361 74.012,51.631 84.504,51.631 87.586,54.713 87.586,59.511 ; 87.587,59.512 91.125,63.05 93.118,63.05 93.125,63.056 93.448,63.056 93.498,63.106 v1(93.498,63.45)
FMC_MGT.DP_C2M_N2: IC41.18 J5.a27 | length 41.4
  TopLayer w0.085: J5.a27@68.228,45.369 68.325,45.369 68.555,45.599 68.626,45.599 69.087,45.138 69.382,45.138 69.631,45.387 69.631,45.631 v2(69.975,45.975)
  BottomLayer w0.085: IC41.18@53.2,68.125 53.2,68.3 53.282,68.382 53.294,68.382 53.344,68.432 53.344,68.553 53.344,68.713 53.518,68.887 54.038,68.887 55.138,67.787 55.263,67.787 55.537,67.513 55.537,53.737 54.8,53 54.8,49.35 56.3,47.85 58.449,47.85 58.599,48 68.25,48 69.325,46.925 69.631,46.619 69.631,46.319 v2(69.975,45.975)
FMC_MGT.DP_C2M_N3: IC36.16 J5.a31 | length 111.5
  TopLayer w0.085: J5.a31@68.228,40.289 68.228,40.767 68.278,40.818 68.868,40.818 68.992,40.942 69.888,41.838 69.974,41.924 70.324,41.924 v2(70.375,41.975)
  BottomLayer w0.085: v2(70.375,41.975) 70.375,42.039 70.182,42.232 70.182,42.303 70.414,42.535 70.414,43.39 73.287,46.262 73.287,47.931 74.15,48.794 74.15,49.775 73.638,50.287 73.134,50.287 72.637,50.784 72.637,51.837 73.438,52.638 83.713,52.638 85.912,54.837 85.912,58.937 87.048,60.073 87.048,61.902 86.5,62.45 86.5,64.975 85.15,66.325 78.4,66.325 75.1,69.625 70.463,69.625 69.101,70.987 64.786,70.987 64.6,71.173 64.6,74.752 65.648,75.8 68.5,75.8 73.438,80.738 77.312,80.738 78.562,79.488 86.588,79.488 87.6,80.5 89.125,80.5 90.55,79.075 95.475,79.075 97.251,77.299 98.324,77.299 98.886,76.736 99.118,76.505 cw(c99.017,76.404) 99.118,76.303 99.107,76.292 ccw(c99.208,76.191) 99.107,76.091 ccw(c99.208,76.191) 99.308,76.091 99.319,76.102 cw(c99.42,76.001) 99.521,76.102 99.799,75.824 99.882,75.741 99.882,74.659 99.748,74.525 IC36.16@99.748,74.35
FMC_MGT.DP_C2M_N4: J5.a35
FMC_MGT.DP_C2M_N5: J5.a39
FMC_MGT.DP_C2M_N6: J5.b37
FMC_MGT.DP_C2M_N7: J5.b33
FMC_MGT.DP_C2M_N8: J5.b29
FMC_MGT.DP_C2M_N9: J5.b25
FMC_MGT.DP_C2M_P0: IC4.B4 J5.c2 | length 38.3
  TopLayer w0.085: J5.c2@65.688,77.119 65.708,77.099 65.708,76.671 65.827,76.551 65.976,76.551 66.255,76.83 66.255,77.355 66.801,77.9 71.933,77.9 72.529,77.304 72.529,77.145 72.579,77.095 72.803,77.095 v2(72.873,77.025) ; v1(92.498,64.45) IC4.B4@92.998,63.95
  BottomLayer w0.085: v2(72.873,77.025) 72.795,77.103 72.587,77.103 72.537,77.152 72.537,77.372 72.99,77.825 76.73,77.825 76.8,77.825 76.95,77.675 79.375,75.25 84.337,75.25 85.987,73.6 86.925,73.6 89.8,70.725 91.888,68.637 91.888,65.018 92.062,64.844 92.448,64.844 92.498,64.794 v1(92.498,64.45)
FMC_MGT.DP_C2M_P1: IC4.D5 J5.a22 | length 35.9
  TopLayer w0.085: J5.a22@68.228,51.719 68.234,51.712 68.234,51.321 68.366,51.19 72.2,51.19 ; 72.2,51.19 72.338,51.19 72.623,51.475 73.588,51.475 73.954,51.108 73.954,50.95 74.004,50.9 74.223,50.9 v1(74.298,50.825) ; v1(93.498,62.45) IC4.D5@93.998,61.95
  BottomLayer w0.085: v1(74.298,50.825) 74.219,50.904 74.046,50.904 73.954,50.996 73.954,51.273 74.1,51.419 84.592,51.419 87.798,54.625 87.798,59.423 ; 87.812,59.438 91.213,62.838 93.206,62.838 93.212,62.844 93.448,62.844 93.498,62.794 v1(93.498,62.45)
FMC_MGT.DP_C2M_P2: IC41.19 J5.a26 | length 41.3
  TopLayer w0.085: J5.a26@68.228,46.639 68.284,46.583 68.284,46.241 69.175,45.35 69.294,45.35 69.419,45.475 69.419,45.631 v2(69.075,45.975)
  BottomLayer w0.085: IC41.19@53.7,68.125 53.7,68.3 53.618,68.382 53.606,68.382 53.556,68.432 53.556,68.625 53.606,68.675 53.95,68.675 55.05,67.575 55.175,67.575 55.325,67.425 55.325,67.225 55.325,66.897 cw(c55.183,66.897) 55.183,66.755 55.087,66.755 ccw(c55.087,66.612) 54.945,66.612 ccw(c55.087,66.612) 55.087,66.47 55.183,66.47 cw(c55.183,66.327) 55.325,66.327 55.325,66.075 55.325,53.825 54.588,53.088 54.588,49.262 56.15,47.7 56.212,47.638 58.536,47.638 58.686,47.788 68.162,47.788 69.025,46.925 69.419,46.531 69.419,46.319 v2(69.075,45.975)
FMC_MGT.DP_C2M_P3: IC36.17 J5.a30 | length 111.6
  TopLayer w0.085: J5.a30@68.228,41.559 68.228,41.08 68.278,41.03 68.78,41.03 69.8,42.05 69.8,42.233 69.644,42.388 v2(69.644,42.5)
  BottomLayer w0.085: 69.013,70.775 64.698,70.775 64.388,71.085 64.388,74.84 65.56,76.012 68.413,76.012 73.351,80.95 77.4,80.95 78.65,79.7 86.5,79.7 87.512,80.712 89.213,80.712 90.638,79.287 95.563,79.287 97.339,77.511 98.411,77.511 100.094,75.829 100.094,74.679 100.248,74.525 IC36.17@100.248,74.35 ; 69.019,70.769 70.375,69.413 75.012,69.413 78.312,66.113 85.062,66.113 86.288,64.887 86.288,62.362 86.836,61.814 86.836,60.161 85.7,59.025 85.7,54.925 83.625,52.85 73.35,52.85 72.425,51.925 72.425,50.696 73.046,50.075 73.55,50.075 73.938,49.687 73.938,48.882 73.075,48.019 73.075,46.35 70.202,43.478 70.202,42.623 70.001,42.421 69.724,42.421 v2(69.644,42.5)
FMC_MGT.DP_C2M_P4: J5.a34
FMC_MGT.DP_C2M_P5: J5.a38
FMC_MGT.DP_C2M_P6: J5.b36
FMC_MGT.DP_C2M_P7: J5.b32
FMC_MGT.DP_C2M_P8: J5.b28
FMC_MGT.DP_C2M_P9: J5.b24
FMC_MGT.DP_M2C_N0: C53.1 J5.c7 | length 16
  TopLayer w0.085: v2(65.05,71.4) 65.053,71.4 65.685,70.769 J5.c7@65.688,70.769
  BottomLayer w0.085: v2(65.05,71.4) 65.44,71.79 65.44,73.79 66.011,74.362 69.062,74.362 70.163,75.463 70.163,76.463 72.905,79.205 73.917,79.205 74.668,79.205 74.718,79.255 74.718,79.393 74.9,79.575 C53.1@74.925,79.575
FMC_MGT.DP_M2C_N1: C55.1 J5.a3 | length 2.7
  TopLayer w0.085: J5.a3@68.228,75.849 68.228,76.316 68.278,76.366 69.473,76.366 69.595,76.244 69.943,76.244 69.993,76.194 69.993,76.057 70.175,75.875 C55.1@70.2,75.875
FMC_MGT.DP_M2C_N2: IC41.16 J5.a7 | length 21.7
  TopLayer w0.085: v2@67.575,71.45 67.575,71.436 68.228,70.783 J5.a7@68.228,70.769
  MidLayer2 w0.11: v2(56.161,68.399) 56.087,68.473 55.922,68.473 55.831,68.564 55.831,68.655 56.028,68.852 56.677,68.852 57.175,69.35 60.4,69.35 60.75,69.7 60.75,70.34 61.135,70.725 62.725,70.725 63.17,71.17 63.17,71.66 63.441,71.931 67.509,71.931 67.573,71.866 v2(67.573,71.45)
  BottomLayer w0.085: IC41.16@52.2,68.125 52.2,68.3 52.282,68.382 52.294,68.382 52.344,68.432 52.344,69.263 52.868,69.787 55.163,69.787 55.818,69.131 55.818,68.71 56.13,68.399 v2(56.161,68.399)
FMC_MGT.DP_M2C_N3: IC36.18 J5.a11 | length 66.6
  TopLayer w0.085: J5.a11@68.228,65.689 68.228,66.175 68.278,66.225 68.675,66.225 68.768,66.318 68.902,66.318 68.994,66.226 68.994,66.053 v2(69.073,65.974)
  BottomLayer w0.085: v2(69.073,65.974) 69.073,65.999 69.392,66.318 69.668,66.318 70.15,66.8 70.187,66.837 70.187,67.028 cw(c70.28,67.028) 70.28,67.12 70.299,67.12 ccw(c70.299,67.213) 70.391,67.213 ccw(c70.299,67.213) 70.299,67.305 70.28,67.305 cw(c70.28,67.398) 70.187,67.398 70.187,67.569 70.187,68.538 69.65,69.075 64.875,69.075 64.388,69.562 63.463,69.562 63.225,69.8 63.225,76.55 63.6,76.925 68.15,76.925 73.175,81.95 81.175,81.95 82.012,81.113 87.013,81.113 87.475,81.575 89.375,81.575 90.862,80.088 95.113,80.088 96.1,81.075 99.175,81.075 100.892,79.358 100.892,74.657 100.842,74.607 100.83,74.607 100.748,74.525 IC36.18@100.748,74.35
FMC_MGT.DP_M2C_N4: J5.a15
FMC_MGT.DP_M2C_N5: J5.a19
FMC_MGT.DP_M2C_N6: J5.b17
FMC_MGT.DP_M2C_N7: J5.b13
FMC_MGT.DP_M2C_N8: J5.b9
FMC_MGT.DP_M2C_N9: J5.b5
FMC_MGT.DP_M2C_P0: C52.1 J5.c6 | length 15.9
  TopLayer w0.085: J5.c6@65.688,72.039 v2(66.298,72.649)
  BottomLayer w0.085: v2(66.298,72.649) 65.923,72.274 65.701,72.274 65.652,72.324 65.652,73.702 66.099,74.15 66.325,74.15 66.653,74.15 cw(c66.653,74.007) 66.795,74.007 66.795,73.882 ccw(c66.938,73.882) 66.938,73.74 ccw(c66.938,73.882) 67.08,73.882 67.08,74.007 cw(c67.223,74.007) 67.223,74.15 67.453,74.15 69.15,74.15 70.375,75.375 70.375,76.375 72.993,78.993 73.829,78.993 74.668,78.993 74.718,78.943 74.718,78.782 74.9,78.6 C52.1@74.925,78.6
FMC_MGT.DP_M2C_P1: C54.1 J5.a2 | length 2.8
  TopLayer w0.085: J5.a2@68.228,77.119 68.228,76.627 68.278,76.578 69.561,76.578 69.683,76.456 69.943,76.456 69.993,76.506 69.993,76.643 70.175,76.825 C54.1@70.2,76.825
FMC_MGT.DP_M2C_P2: IC41.17 J5.a6 | length 21.5
  TopLayer w0.085: v2@67.575,72.649 68.185,72.039 J5.a6@68.228,72.039
  MidLayer2 w0.11: v2(55.264,68.336) 55.338,68.411 55.503,68.411 55.594,68.501 55.594,68.753 55.93,69.089 56.579,69.089 57.077,69.587 60.302,69.587 60.513,69.798 60.513,70.438 61.037,70.962 62.627,70.962 62.933,71.268 62.933,71.758 63.343,72.168 67.509,72.168 67.573,72.232 v2(67.573,72.649)
  BottomLayer w0.085: IC41.17@52.7,68.125 52.7,68.3 52.618,68.382 52.606,68.382 52.556,68.432 52.556,69.175 52.956,69.575 55.075,69.575 55.525,69.125 55.606,69.044 55.606,68.71 55.264,68.367 v2(55.264,68.336)
FMC_MGT.DP_M2C_P3: IC36.19 J5.a10 | length 66.6
  TopLayer w0.085: J5.a10@68.228,66.959 68.228,66.487 68.278,66.437 68.587,66.437 68.68,66.53 68.902,66.53 68.994,66.621 68.994,66.682 69.073,66.762 v2(69.073,66.874)
  BottomLayer w0.085: v2(69.073,66.874) 69.073,66.849 69.392,66.53 69.58,66.53 69.975,66.925 69.975,68.45 69.562,68.863 64.787,68.863 64.3,69.35 63.375,69.35 63.013,69.712 63.013,76.638 63.512,77.137 68.062,77.137 73.087,82.162 81.263,82.162 82.1,81.325 86.925,81.325 87.387,81.787 89.463,81.787 90.95,80.3 95.025,80.3 96.012,81.287 99.263,81.287 101.104,79.446 101.104,74.657 101.154,74.607 101.165,74.607 101.248,74.525 IC36.19@101.248,74.35
FMC_MGT.DP_M2C_P4: J5.a14
FMC_MGT.DP_M2C_P5: J5.a18
FMC_MGT.DP_M2C_P6: J5.b16
FMC_MGT.DP_M2C_P7: J5.b12
FMC_MGT.DP_M2C_P8: J5.b8
FMC_MGT.DP_M2C_P9: J5.b4
FMC_MGT.GBTCLK_M2C_N0: C200.2 IC4.E6 | length 33.8
  TopLayer w0.085: C200.2@71.073,73.5 71.34,73.767 71.34,73.844 71.39,73.894 72.381,73.894 72.781,74.294 72.781,74.453 72.873,74.544 73.046,74.544 v2(73.125,74.624) ; v1(94.498,61.45) IC4.E6@94.998,60.95
  SignalLayer1 w0.11: v2(73.125,74.624) 73.117,74.624 72.815,74.322 72.815,74.231 72.88,74.166 74.344,74.166 75.262,73.248 75.262,71.838 77.225,69.875 78.748,69.875 84.711,63.912 88.498,63.912 90.927,63.912 91.07,64.055 93.829,64.055 94.125,63.759 94.125,61.133 94.189,61.069 94.434,61.069 94.498,61.133 v1(94.498,61.45)
FMC_MGT.GBTCLK_M2C_N1: J5.b21
FMC_MGT.GBTCLK_M2C_P0: C199.2 IC4.F6 | length 33.9
  TopLayer w0.085: C199.2@71.073,74.5 71.34,74.233 71.34,74.156 71.39,74.106 72.293,74.106 72.569,74.382 72.569,74.453 72.477,74.544 72.304,74.544 v2(72.225,74.624) ; v1(94.498,60.45) IC4.F6@94.998,59.95
  SignalLayer1 w0.11: v2(72.225,74.624) 72.233,74.624 72.578,74.278 72.578,74.132 72.781,73.929 74.246,73.929 75.025,73.15 75.025,71.74 77.127,69.638 78.65,69.638 84.613,63.675 88.498,63.675 91.025,63.675 91.168,63.818 93.731,63.818 93.888,63.661 93.888,61.035 94.091,60.832 94.434,60.832 94.498,60.767 v1(94.498,60.45)
FMC_MGT.GBTCLK_M2C_P1: J5.b20
FMC_PG_C2M: IC10.21 IC37.4 J5.d1 R123.1 | length 98.2
  TopLayer w0.125: v2(54.348,79.75) 53.748,79.15 53.748,69 54.875,67.873 54.875,65.877 53.748,64.75 53.748,30.75 56.323,28.175 64.398,28.175 64.834,27.739 66.734,27.739 69.698,24.775 81.325,24.775 81.512,24.963 83.388,24.963 IC37.4@83.55,25.125 84.705,25.125 84.893,24.938 86.086,24.938 IC10.21@86.248,24.775
  TopLayer w0.3: J5.d1@64.418,78.389 64.51,78.389 64.959,78.838 65.037,78.838 v2(65.075,78.876)
  BottomLayer w0.125: v2(54.348,79.75) 55.298,80.7 62.533,80.7 62.75,80.482 62.75,80.462 62.978,80.235 R123.1@62.998,80.235 63.071,80.162 63.091,80.162 63.775,79.478 64.473,79.478 v2(65.075,78.876)
FMC_PG_M2C: J5.f1 R122.1 R258.1 | length 3.3
  TopLayer w0.3: J5.f1@61.878,78.389 62.509,79.02 v2(62.518,79.02)
  BottomLayer w0.125: R258.1@61.073,80.23 61.993,80.23 R122.1@61.998,80.235 61.998,79.54 v2(62.518,79.02)
FMC_PG_M2C_1V5: IC4.M17 R258.2 R259.2 | length 73.1
  TopLayer w0.11: v1(100.498,53.45) 100.498,54.175 100.667,54.344 102.161,54.344 102.331,54.174 102.665,54.174 102.835,54.344 105.161,54.344 105.555,53.95 IC4.M17@105.998,53.95
  SignalLayer1 w0.125: v2(67.898,79.075) 68.248,79.425 69.3,79.425 71.225,77.5 77.123,77.5 80.923,73.7 82.448,73.7 89.198,66.95 98.523,66.95 100.023,65.45 100.023,62.25 99.698,61.925 98.273,61.925 98.023,61.675 98.023,60.325 98.373,59.975 98.698,59.975 99.023,59.65 99.023,54.925 v1(100.498,53.45)
  BottomLayer w0.125: R258.2@61.073,81.17 61.093,81.17 61.32,81.397 61.32,81.417 61.553,81.65 61.848,81.65 61.973,81.775 63.548,81.775 64.87,83.097 66.065,83.097 R259.2@66.173,83.205 68.693,83.205 69.448,82.45 69.448,81.65 67.898,80.1 v2(67.898,79.075)
FMC_PS_N: IC10.2 IC37.14 J5.h2 R97.2 R121.1 | length 172.2
  TopLayer w0.125: v2(49.825,73.825) 49.825,63.75 49.15,63.075 49.15,62.75 50.5,61.4 50.5,53.925 v2(50.525,53.925) ; v2(87.726,20.301) 88,20.575 IC37.14@89.45,20.575 89.532,20.657 90.289,20.657 90.507,20.875 IC10.2@93.248,20.875 94.5,20.875 95.509,21.884 97.023,21.884 97.111,21.972 97.111,22.016 97.873,22.777 100.048,22.777 100.09,22.735 100.423,22.735 100.465,22.777 104.978,22.777 106.082,21.673 109.022,21.673 v2(110.323,22.975)
  TopLayer w0.3: J5.h2@59.338,77.119 59.969,77.75 v2(59.978,77.75)
  BottomLayer w0.125: v2(49.825,73.825) 49.798,73.852 49.798,77.825 51.273,79.3 55.398,79.3 56.333,80.235 R121.1@59.248,80.235 59.248,78.48 v2(59.978,77.75) ; v2(50.525,53.925) 50.525,53.026 50.526,53.025 50.526,22.897 55.323,18.1 68.398,18.1 84.373,34.075 85.148,34.075 86.173,33.05 86.173,29.727 90.598,25.302 90.598,23.173 v2(87.726,20.301) ; v2(110.323,22.975) 111.6,21.699 118.739,21.699 118.992,21.952 123.875,21.952 124.968,23.045 R97.2@124.968,24.45
FMC_REF0_CLK.CLK_N: C214.2 IC1.23 R16.1 | length 44.4
  TopLayer w0.1: v1(52.048,73.775) 52.014,73.775 51.839,73.95 51.478,73.95 50.846,73.95 50.075,74.721 50.075,78.879 52.171,80.975 61.376,80.975 64.876,84.475 70.379,84.475 73.054,81.8 80.234,81.8 80.281,81.754 80.581,81.754 80.64,81.813 80.64,81.84 80.88,82.08 R16.1@80.9,82.08 80.92,82.08 81.16,81.84 81.16,81.835 81.219,81.776 81.36,81.776 81.409,81.825 82.614,81.825 82.701,81.912 83.01,81.912 IC1.23@83.048,81.95
  BottomLayer w0.1: v1(52.048,73.775) 52.084,73.775 52.257,73.948 52.479,73.948 52.538,73.889 52.538,73.71 C214.2@52.798,73.45
FMC_REF0_CLK.CLK_P: C213.2 IC1.24 R15.1 | length 43.6
  TopLayer w0.1: v1(52.048,74.375) 52.014,74.375 51.839,74.2 51.374,74.2 50.95,74.2 50.325,74.825 50.325,78.775 52.275,80.725 61.48,80.725 64.98,84.225 70.275,84.225 71.6,82.9 72.95,81.55 80.131,81.55 80.177,81.504 80.606,81.504 80.665,81.445 80.665,81.44 80.905,81.2 R15.1@80.925,81.2 80.945,81.2 81.185,81.44 81.185,81.467 81.244,81.526 81.464,81.526 81.513,81.575 82.614,81.575 82.739,81.45 IC1.24@83.048,81.45
  BottomLayer w0.1: v1(52.048,74.375) 52.057,74.375 52.257,74.175 52.479,74.175 52.538,74.234 52.538,74.44 C213.2@52.798,74.7
FMC_REF1_CLK.CLK_N: C218.2 IC1.27 R11.1 | length 43.7
  TopLayer w0.1: v1(55.298,76.1) 55.298,76.181 55.113,76.366 55.113,76.38 55.054,76.439 54.971,76.439 54.596,76.439 54.35,76.685 54.35,78.354 56.096,80.1 61.975,80.1 64.75,82.875 68.579,82.875 71.354,80.1 77.104,80.1 81.204,76 83.7,76 84.248,76.548 84.248,78.121 84.189,78.18 83.988,78.18 R11.1@83.748,78.42 83.988,78.66 84.189,78.66 84.248,78.719 84.248,79.15 84.873,79.775 84.873,80.316 84.748,80.441 IC1.27@84.748,80.75
  BottomLayer w0.1: C218.2@54.698,75.95 54.954,76.206 55.189,76.206 55.295,76.1 v1(55.298,76.1)
FMC_REF1_CLK.CLK_P: C217.2 IC1.28 R9.1 | length 43.1
  TopLayer w0.1: v1(55.273,77.028) 55.273,76.947 55.113,76.786 55.113,76.748 55.054,76.689 54.868,76.689 54.7,76.689 54.6,76.789 54.6,78.25 56.2,79.85 62.079,79.85 64.854,82.625 68.475,82.625 71.25,79.85 77,79.85 81.1,75.75 83.804,75.75 84.498,76.444 84.498,78.121 84.557,78.18 84.758,78.18 R9.1@84.998,78.42 84.758,78.66 84.557,78.66 84.498,78.719 84.498,79.046 85.123,79.671 85.123,80.316 85.248,80.441 IC1.28@85.248,80.75
  BottomLayer w0.1: C217.2@54.698,77.2 54.87,77.028 v1(55.273,77.028)
FMC_VIO_B_M2C: J5.j39 J5.k40 | length 1.8
  TopLayer w0.3: J5.k40@56.798,28.859 57.429,29.49 v2(57.438,29.49) ; J5.j39@58.068,30.129 58.699,30.76 v2(58.708,30.76)
FMC_VREFA_M2C: C41.2 C45.2 IC4.C20 IC4.D15 J5.h1 | length 75.4
  TopLayer w0.125: IC4.D15@103.998,61.95 v1(104.498,62.45) ; IC4.C20@108.998,62.95 v1(109.498,63.45)
  TopLayer w0.3: J5.h1@59.338,78.389 59.969,79.02 v2(59.978,79.02)
  MidLayer2 w0.3: v2(59.978,79.02) 60.598,78.4 74.525,78.4 74.549,78.376 87.749,78.376 87.851,78.274 88.501,78.274 92.35,74.425 102.173,74.425 v2(103.123,73.475)
  BottomLayer w0.3: v2(103.123,73.475) v2@103.137,73.461 ; v1(104.498,62.45) 104.024,62.924 104.024,63.061 C45.2@103.974,63.111 103.974,63.136 103.924,63.186 103.711,63.186 103.535,63.362 103.535,64.135 103.723,64.323 103.723,67.275 104.823,68.375 104.823,72.55 103.906,73.467 103.901,73.461 v2@103.137,73.461 ; v1(109.498,63.45) C41.2@109.948,63.9 ; C41.2@109.998,64.1 109.998,64.125 109.948,64.175 109.923,64.175 109.762,64.336 109.699,64.336 109.348,64.687 109.348,67.325 108.948,67.725 108.948,70.1 105.598,73.45 105.015,73.45 104.94,73.525 104.11,73.525 104.046,73.461 v2@103.137,73.461
FMC_VREFB_M2C: C64.2 C65.2 IC4.V3 IC4.W7 J5.k1 | length 73.4
  TopLayer w0.125: v1(91.498,47.45) IC4.V3@91.998,47.95 ; v1(95.485,46.688) 95.531,46.734 95.737,46.734 95.954,46.95 IC4.W7@95.998,46.95
  TopLayer w0.3: J5.k1@56.798,78.389 57.429,79.02 v2(57.438,79.02)
  MidLayer2 w0.125: v2(55.723,51.95) 55.723,66.425 54.825,67.323 54.825,69.45 55.723,70.348 55.723,72.2 56.723,73.2 56.723,78.305 v2(57.438,79.02)
  MidLayer2 w0.3: v1(91.498,47.45) 91.948,47 95.173,47 v1(95.485,46.688)
  SignalLayer1 w0.125: v2(55.723,51.95) 55.723,52 57.248,50.475 64.548,50.475 64.848,50.175 73.698,50.175 74.666,49.207 79.997,49.207 80.115,49.089 80.394,49.089 v1(80.447,49.036)
  BottomLayer w0.125: v1(80.447,49.036) 80.478,49.005 80.627,49.005 81.158,48.475 88.498,48.475 90.298,48.475 90.823,47.95 C64.2@90.848,47.95 90.985,47.813 91.135,47.813 v1(91.498,47.45) ; C65.2@94.998,46.3 94.998,46.325 95.135,46.463 95.275,46.463 95.485,46.673 v1(95.485,46.688)
FPGA_DONE: IC4.G11 R78.1 R107.1 T16.1 | length 147.7
  TopLayer w0.125: v2(84.923,33.4) 85.748,34.225 95.848,34.225 99.162,37.538 ; 99.162,37.539 99.273,37.651 v1(99.273,37.725) 99.273,38.143 100.23,39.1 100.581,39.1 102.106,40.625 103.299,40.625 103.718,41.043 103.718,41.525 104.109,41.916 106.257,41.916 109.673,38.5 109.975,38.5 111.15,37.325 113.248,37.325 113.747,36.826 118.373,36.826 118.598,37.052 121.924,37.052 122.2,36.775 v2(122.275,36.775) ; v1(99.498,58.45) IC4.G11@99.998,58.95
  MidLayer2 w0.125: v1(99.273,37.725) 99.273,38.65 99.867,39.244 99.867,40.569 100.373,41.075 100.373,42.95 99.898,43.425 99.898,50.836 99.837,50.898 99.837,57.59 99.498,57.929 v1(99.498,58.45)
  BottomLayer w0.125: T16.1@30.3,1.15 30.3,2.15 30.103,2.347 R78.1@30.23,2.475 30.23,2.495 31.01,3.275 33,3.275 33.25,3.025 38.075,3.025 40.4,5.35 40.4,8.3 41.775,9.675 41.775,11.35 42.55,12.125 43.675,12.125 43.777,12.227 43.777,13.329 43.775,13.33 43.775,14.23 43.953,14.408 44.102,14.408 44.295,14.601 44.295,15.289 44.606,15.6 48,15.6 48.8,14.8 66.323,14.8 v2(84.923,33.4) ; v2(122.275,36.775) 122.275,34.425 123.011,33.689 126.459,33.689 126.673,33.903 126.693,33.903 126.92,34.13 R107.1@126.92,34.15
FPGA_I2C.SCL: IC4.V22 IC8.19 IC21.3 IC21.10 R28.1 | length 53.8
  TopLayer w0.125: IC8.19@101.748,27.65 101.748,30.544 101.952,30.749 101.989,30.749 102.225,30.984 102.225,31.522 102.073,31.674 v2(102.073,31.775) ; IC4.V22@110.998,47.95 v1(111.498,47.95) ; v2@112.325,33.164 112.325,32.316 112.892,31.748 116.452,31.748 116.826,31.374 120.249,31.374 120.398,31.523 120.398,32.073 121.375,33.05 IC21.10@124.398,33.05 ; v2(117.45,34.625) 117.725,34.35 IC21.3@118.598,34.35
  MidLayer2 w0.125: v1(111.498,47.95) 111.123,47.575 111.123,39.15 111.898,38.375 111.898,35.85 v2(111.523,35.475) 111.123,35.075 111.123,33.648 111.696,33.075 114.125,33.075 115.175,34.125 116.95,34.125 v2(117.45,34.625)
  SignalLayer1 w0.125: v2(102.073,31.775) 105.723,35.425 111.473,35.425 v2(111.523,35.475)
  other v2: 112.325,33.075
FPGA_I2C.SDA: IC4.T21 IC8.20 IC21.2 IC21.9 R29.1 | length 50.2
  TopLayer w0.125: IC8.20@101.248,27.65 101.248,30.17 R29.1@101.278,30.2 101.297,30.219 101.297,30.624 v2(101.823,31.15) ; IC4.T21@109.998,49.95 v1(110.498,49.45) ; IC21.2@118.598,35 118.623,35.025 v2(120.023,35.025) ; v2(120.8,31.65) 121.55,32.4 IC21.9@124.398,32.4
  MidLayer2 w0.125: v1(110.498,49.45) 112.323,47.625 112.323,42.45 112.323,35.173 111.573,34.423 v2(111.573,33.95) 113.6,33.95 114.85,35.2 116.35,35.2 116.55,35.4 119.562,35.4 119.937,35.025 v2(120.023,35.025) 120.55,34.498 120.55,33.925 120.837,33.638 120.837,31.687 v2(120.8,31.65)
  SignalLayer1 w0.125: v2(101.823,31.15) 105.473,31.15 108.273,33.95 v2(111.573,33.95)
FPGA_INIT_B: IC4.U12 R81.1 T6.3 | length 39.6
  TopLayer w0.125: IC4.U12@100.998,48.95 v1(101.498,48.45) ; v1(103.298,39.725) 103.322,39.749 103.322,39.999 104.098,40.775 105.498,40.775 110.473,35.8 110.473,33.427 111.213,32.687 111.213,31.862 111.875,31.2 116.1,31.2 116.5,30.8 119.773,30.8 121.475,29.098 121.475,28.6 v2(121.482,28.593)
  MidLayer2 w0.125: v1(101.498,48.45) 101.498,45.929 101.998,45.429 101.998,41.025 v1(103.298,39.725)
  BottomLayer w0.125: v2(121.482,28.593) 121.49,28.6 122,28.6 122.6,28 123.228,28 R81.1@123.248,27.98 124.378,27.98 T6.3@124.598,28.2
FPGA_JTAG.TCK: IC4.V12 IC9.6 | length 29.1
  TopLayer w0.125: IC4.V12@100.998,47.95 101.498,47.45 v1(101.498,45.45) ; v1(102.698,39.675) 102.698,39.325 103.723,38.3 103.723,36.025 104.2,35.549 106.825,35.549 107.323,35.05 107.323,33.375 104.648,30.7 104.648,28.6 106.273,26.975 107.179,26.975 107.379,26.775 IC9.6@108.348,26.775
  MidLayer2 w0.125: v1(101.498,45.45) 101.498,45.376 101.598,45.276 101.598,40.775 v1(102.698,39.675)
FPGA_JTAG.TDI: IC4.R13 IC9.8 | length 32.3
  TopLayer w0.1: v1(104.273,40.424) 104.325,40.475 104.948,40.475 107.309,38.114 108.698,36.725 108.698,31.775 111.648,28.825 111.648,27.1 110.023,25.475 IC9.8@108.348,25.475
  TopLayer w0.125: IC4.R13@101.998,50.95 v1(102.498,50.45)
  MidLayer2 w0.1: v1(102.498,50.45) 103.172,49.776 103.172,49.113 103.172,44.576 103.598,44.15 103.598,42.075 103.947,41.726 103.947,40.801 104.273,40.475 v1(104.273,40.424)